# Altium PCB PCB1.pcbdoc
Units mil, origin at the board's own origin, x right, y up, seen from the top; angles counter-clockwise.
Board outline 3474.41 x 2203.83 mil, 2 copper layers (Top Layer, Bottom Layer), stack 62.206 mil thick; 45 components, 37 nets, 140 pads, 20 vias.
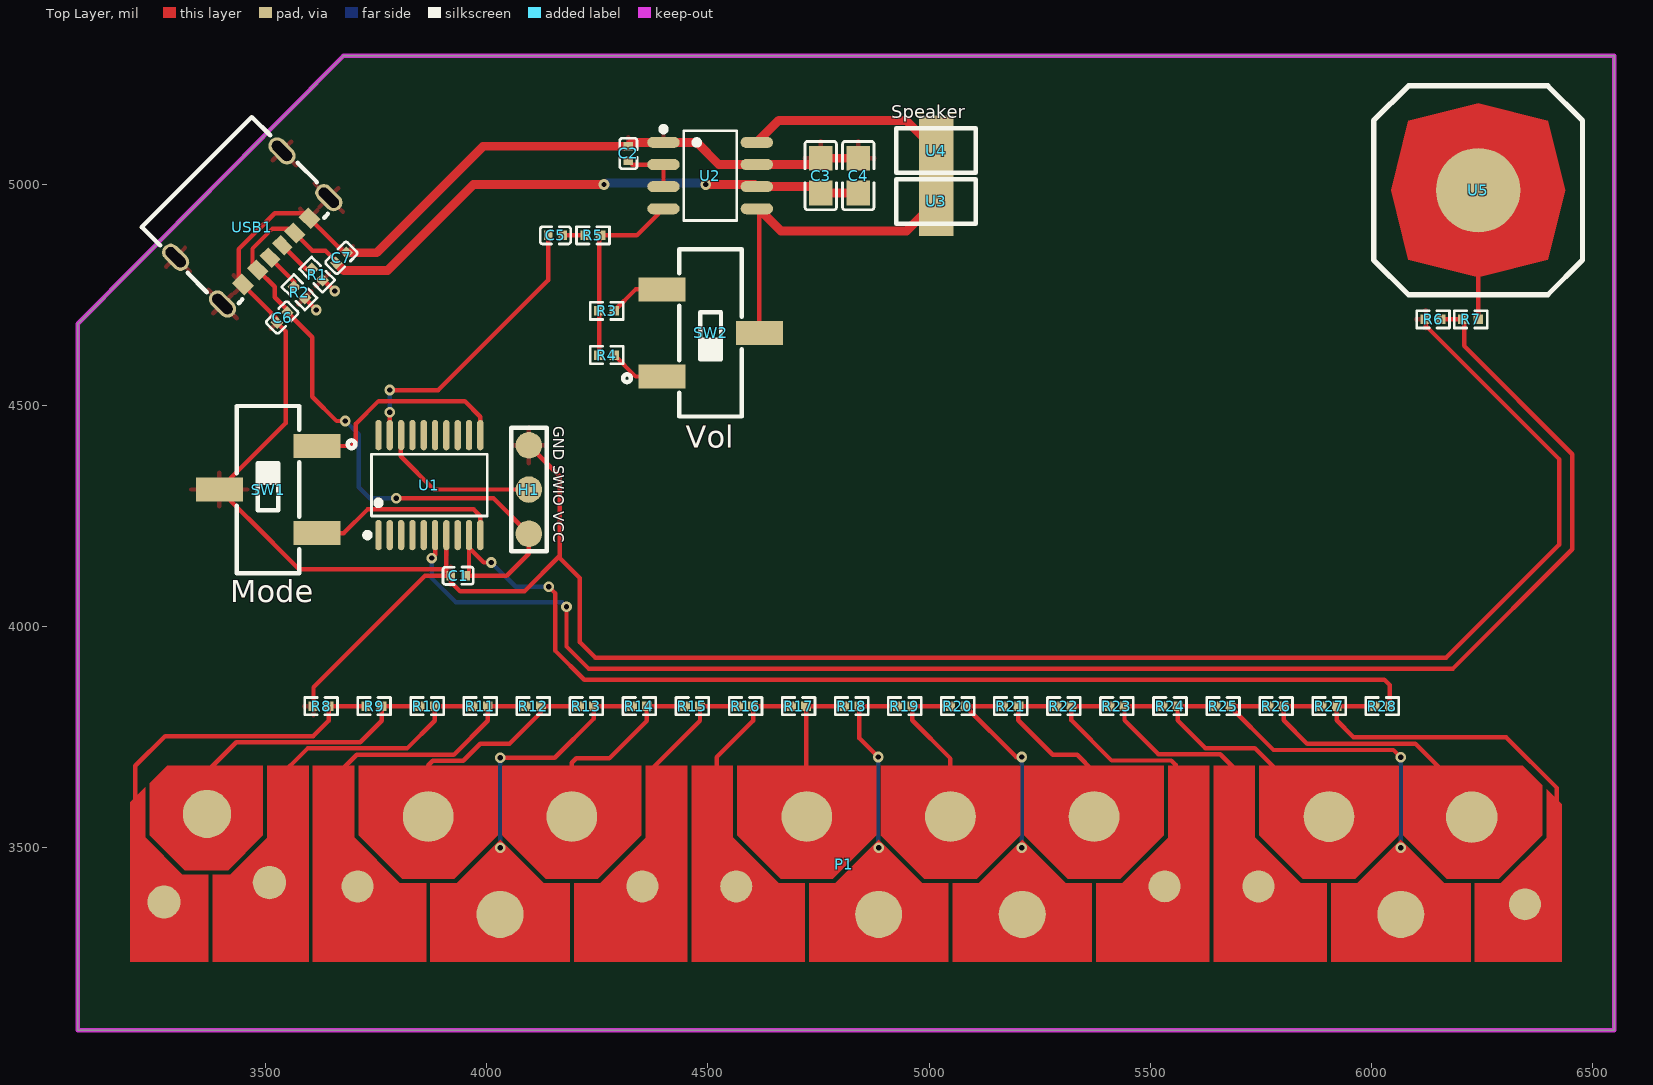
[diagram p0: Top Layer view]
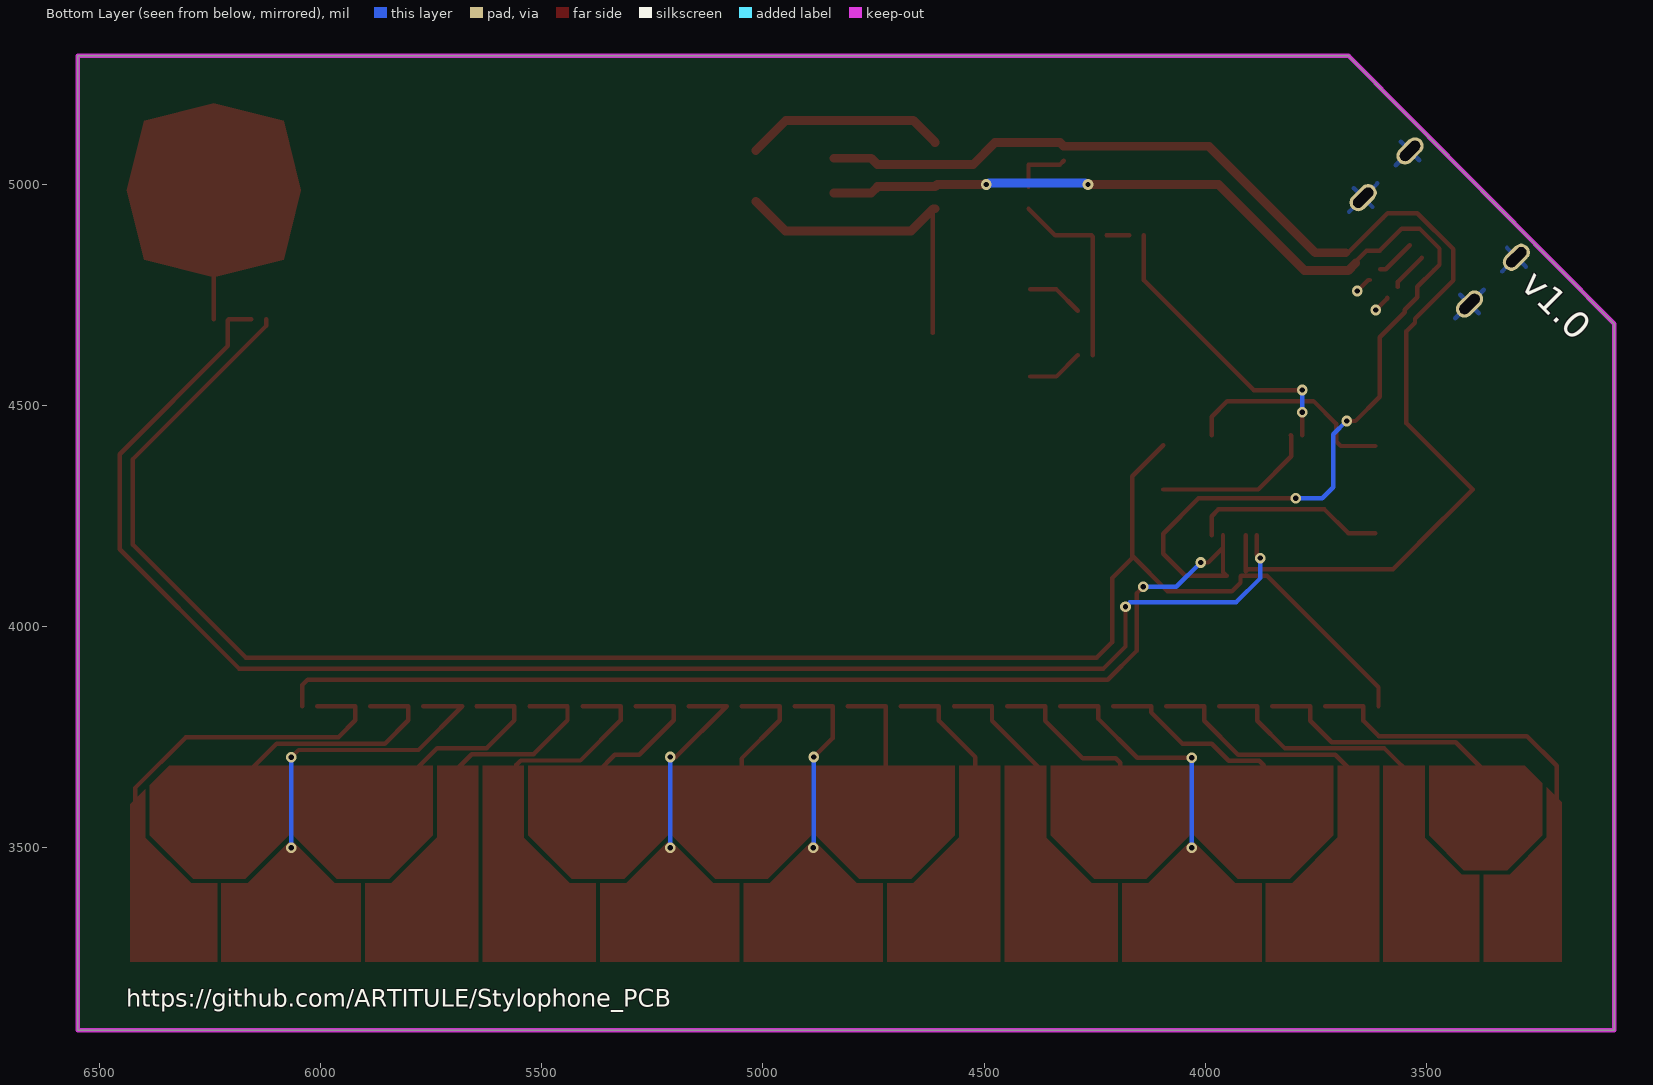
[diagram p1: Bottom Layer view, seen from below]

## Layer stack, top to bottom
Top Solder Mask Layer: solder mask 0.394, Dk 3.3
Top Layer: signal copper 1.379
Dielectric1: surface 59.449, FR4, Dk 4.5
Bottom Layer: signal copper 1.378
Bottom Solder Mask Layer: solder mask 0.394, Dk 3.3

## Board outline
3075,4685.14 3675.46,5290.76 6549.41,5290.76 6549.41,3086.93 3075,3086.93

## Design rules (kind name [scope] priority, off if disabled: settings)
BoardOutlineClearance copperThickness1oz [All] p0: genericclearance=10 ignorepadtopadclearanceinfootprint=FALSE except(0: Arc-SplitContinuation Track-SplitContinuation SMDPad-SplitContinuation THPad-SplitContinuation Via-SplitContinuation Fill-SplitContinuation Poly-SplitContinuation Region-SplitContinuation Text-SplitContinuation)
BoardOutlineClearance copperThickness2oz [All] p0: genericclearance=10 ignorepadtopadclearanceinfootprint=FALSE except(0: Arc-SplitContinuation Track-SplitContinuation SMDPad-SplitContinuation THPad-SplitContinuation Via-SplitContinuation Fill-SplitContinuation Poly-SplitContinuation Region-SplitContinuation Text-SplitContinuation)
BoardOutlineClearance otherClearance [All] p0: genericclearance=10 ignorepadtopadclearanceinfootprint=FALSE except(0: Arc-SplitContinuation Track-SplitContinuation SMDPad-SplitContinuation THPad-SplitContinuation Via-SplitContinuation Fill-SplitContinuation Poly-SplitContinuation Region-SplitContinuation Text-SplitContinuation)
Clearance copperThickness1oz [All] p1: gap=7 ignorepadtopadclearanceinfootprint=FALSE
Clearance copperThickness2oz [All] p1: gap=7 ignorepadtopadclearanceinfootprint=FALSE
Clearance otherClearance [All] p1: gap=7 ignorepadtopadclearanceinfootprint=FALSE
DiffPairsRouting differentialPair [All] p1: maxuncoupledlength=10 minlimit=6 maxlimit=Infinity mostfreqgap=6 toplayer_minwidth=5 toplayer_prefwidth=10 toplayer_maxwidth=100 bottomlayer_minwidth=5 bottomlayer_prefwidth=10 bottomlayer_maxwidth=100
PasteMaskExpansion pasteMaskExpansion [All] p1: expansion=0
PlaneConnect innerPlane [All] p1: planeconnectstyle=Relief reliefexpansion=20 reliefentries=4 reliefconductorwidth=10 reliefairgap=10
PolygonConnect copperRegion [All] p1: connectstyle=Relief reliefentries=4 reliefconductorwidth=10 polygonreliefangle="90 Angle" airgapwidth=10
RoutingVias viaSize [All] p1: viastyle="Through Hole" holewidth=12.0078 minholewidth=11.811 maxholewidth=248.0314 width=12.0078 minwidth=11.811 maxwidth=248.0314
SolderMaskExpansion solderMaskExpansion [IsVia] p1: useseparateexpansions=TRUE expansion=-1000 expansionbottom=-1000
SolderMaskExpansion solderMaskExpansion [All] p2: useseparateexpansions=TRUE expansion=2 expansionbottom=2
Width copperThickness1oz [All] p1: maxlimit=100 minlimit=5 preferedwidth=10
Width copperThickness2oz [All] p1: maxlimit=100 minlimit=8 preferedwidth=10

## Components (designator, comment, footprint, x,y, rotation, side; value= is the part's Value field where it differs from the comment)
C1 "100nF" C0402 3935,4115 r0 top
C2 "1uF" C0402 4320,5070 r270 top
C3 "1uF" C0805 4755,5020 r270 top
C4 "22uF" C0805 4840,5020 r270 top
C5 "470nF" C0402 4155,4885 r0 top
C6 "100nF" C0402 3537,4699 r45 top
C7 "1uF" C0402 3671,4834 r225 top
H1 "" "Top side pads" 4095,4210 r180 top
P1 "Stylophone Pads" Stylophone_Pads_Footprint 3193.11,3242.48 r0 top
R1 "5.1kΩ" R0402 3616,4796 r135 top
R2 "5.1kΩ" R0402 3576,4756 r135 top
R3 "18kΩ" R0402 4270.89,4714.11 r0 top
R4 "51kΩ" R0402 4270.89,4614.11 r0 top
R5 "18kΩ" R0402 4240,4885 r0 top
R6 "1.6MΩ" R0402 6140,4695 r0 top
R7 "1kΩ" R0402 6225,4695 r0 top
R8 "1kΩ" R0402 3625,3820 r0 top
R9 "1kΩ" R0402 3745,3820 r0 top
R10 "1kΩ" R0402 3865,3820 r180 top
R11 "1kΩ" R0402 3985,3820 r180 top
R12 "1kΩ" R0402 4105,3820 r180 top
R13 "1kΩ" R0402 4225,3820 r180 top
R14 "1kΩ" R0402 4345,3820 r180 top
R15 "1kΩ" R0402 4465,3820 r180 top
R16 "1kΩ" R0402 4585,3820 r180 top
R17 "1kΩ" R0402 4705,3820 r180 top
R18 "1kΩ" R0402 4825,3820 r180 top
R19 "1kΩ" R0402 4945,3820 r180 top
R20 "1kΩ" R0402 5065,3820 r180 top
R21 "1kΩ" R0402 5185,3820 r180 top
R22 "1kΩ" R0402 5305,3820 r180 top
R23 "1kΩ" R0402 5425,3820 r180 top
R24 "1kΩ" R0402 5545,3820 r180 top
R25 "1kΩ" R0402 5665,3820 r180 top
R26 "1kΩ" R0402 5785,3820 r180 top
R27 "1kΩ" R0402 5905,3820 r180 top
R28 "1kΩ" R0402 6025,3820 r180 top
SW1 "LSSAM12-V-T/R" SW-SMD_LSSAM12-V-T-R 3505,4310 r270 top
SW2 "LSSAM12-V-T/R" SW-SMD_LSSAM12-V-T-R 4505.89,4664.11 r90 top
U1 "CH32V003F4P6" TSSOP-20_L6.5-W4.4-P0.65-LS6.4-BL 3870,4320 r0 top
U2 "FM8002A" SOP-8_L4.9-W3.9-P1.27-LS6.0-BL 4505,5020 r270 top
U3 "" Pad2mmx4mm 5095,4883 r90 top
U4 "" Pad2mmx4mm 5095,4998 r90 top
U5 "" Big_Pad_5x5mm 6045,4790 r0 top
USB1 "USB4125-GF-A" USB-C-SMD_TYPE-C-6P 3470,4902.03 r225 top

## Footprints (in the part's own frame and the unit in brackets; to place one, negate y for a bottom-side part, rotate by r counter-clockwise, add the part's x,y. Pads: shape width x height; smd on the part's side, far side on the other; paste and mask are expansions set on the pad)
Big_Pad_5x5mm [mm]
  round 4.851 smd: 1(5,5)
  Top Layer region: 5,0 1,1 0,5 1,9 5,10 9,9 10,5 9,1
  silkscreen extent -1,-1 11,11
C0402 [mm]
  rect 0.5x0.54 smd paste+0 mask+0.051: 1(-0.42,0) 2(0.42,0)
  silkscreen extent -0.87,-0.5 0.87,0.5
C0805 [mm]
  rect 1.41x1.35 smd paste-100 mask+0.051: 1(-1,0) 2(1,0)
  silkscreen extent -1.96,-0.9 1.96,0.9
Pad2mmx4mm [mm]
  rect 4x2 smd: 1(2,2)
  silkscreen extent 0.71,-0.28 3.28,4.29
R0402 [mm]
  rect 0.566x0.54 smd paste-100 mask+0.051: 1(-0.433,0) 2(0.433,0)
  silkscreen extent -0.94,-0.5 0.94,0.5
SOP-8_L4.9-W3.9-P1.27-LS6.0-BL [mm]
  oval 0.63x1.865 smd: 1(-1.905,-2.682) 2(-0.635,-2.682) 3(0.635,-2.682) 4(1.905,-2.682) 5(1.905,2.682) 6(0.635,2.682) 7(-0.635,2.682) 8(-1.905,2.682)
  silkscreen extent -2.82,-2.83 2.58,1.52
Stylophone_Pads_Footprint [mm]
  round 1.899 smd: 1(1.948,3.419)
  round 2.768 smd: 2(4.417,8.482)
  round 1.92 smd: 3(8.003,4.538)
  round 1.846 smd: 4(13.072,4.317) 16(64.821,4.318)
  round 2.92 smd: 5(17.125,8.33) 7(25.375,8.33) 10(38.875,8.33) 12(47.125,8.33) 14(55.375,8.33)
  round 2.706 smd: 6(21.25,2.706) 11(43,2.706) 13(51.25,2.706) 18(73,2.706)
  round 1.844 smd: 8(29.428,4.32)
  round 1.845 smd: 9(34.821,4.32)
  round 1.843 smd: 15(59.429,4.322)
  round 2.918 smd: 17(68.875,8.328)
  round 2.959 smd: 19(77.074,8.297)
  round 1.832 smd: 20(80.129,3.288)
  Top Layer region: 3.125,5.25 1.125,7.25 1.125,10.25 2.125,11.25 7.625,11.25 7.625,7.25 5.625,5.25
  Top Layer region: 10.25,0 4.75,0 4.75,5 5.75,5 7.864,7.114 7.864,11.246 10.25,11.246
  Top Layer region: 0,0 0.003,9.157 0.871,10.026 0.871,7.129 3,5 4.5,5 4.5,0
  Top Layer region: 13.125,11.25 21.125,11.25 21.125,7.25 18.625,4.75 15.625,4.75 13.125,7.25
  Top Layer region: 17.25,0 17.25,4.5 18.75,4.5 21.25,7 23.75,4.5 25.25,4.5 25.25,0
  Top Layer region: 21.375,11.25 29.375,11.25 29.375,7.25 26.875,4.75 23.875,4.75 21.375,7.25
  Top Layer region: 10.5,0 10.5,11.239 12.872,11.239 12.872,7.128 15.5,4.5 17,4.5 17,0
  Top Layer region: 25.5,4.5 27,4.5 29.624,7.124 29.624,11.244 32,11.244 32,0 25.5,0
  Top Layer region: 34.875,11.25 42.875,11.25 42.875,7.25 40.375,4.75 37.375,4.75 34.875,7.25
  Top Layer region: 39,0 39,4.5 40.5,4.5 43,7 45.5,4.5 47,4.5 47,0
  Top Layer region: 47.25,0 47.25,4.5 48.75,4.5 51.25,7 53.75,4.5 55.25,4.5 55.25,0
  Top Layer region: 51.375,11.25 59.375,11.25 59.375,7.25 56.875,4.75 53.875,4.75 51.375,7.25
  Top Layer region: 43.125,11.25 51.125,11.25 51.125,7.25 48.625,4.75 45.625,4.75 43.125,7.25
  Top Layer region: 32.25,0 32.25,11.255 34.616,11.255 34.616,7.134 37.25,4.5 38.75,4.5 38.75,0
  Top Layer region: 55.5,0 55.5,4.5 57,4.5 59.625,7.125 59.625,11.251 62,11.251 62,0
  Top Layer region: 62.25,0 62.25,11.259 64.61,11.259 64.61,7.14 67.25,4.5 68.75,4.5 68.75,0
  Top Layer region: 64.875,11.246 72.875,11.246 72.875,7.25 70.375,4.75 67.375,4.75 64.875,7.25
  Top Layer region: 69,0 69,4.5 70.5,4.5 73,7 75.5,4.5 77,4.5 77,0
  Top Layer region: 73.125,11.255 79.992,11.255 81.125,10.122 81.125,7.25 78.625,4.75 75.625,4.75 73.125,7.25
  Top Layer region: 77.25,0 77.25,4.5 78.75,4.5 81.366,7.116 81.366,9.908 82.248,9.026 82.25,0
SW-SMD_LSSAM12-V-T-R [mm]
  rect 1.4x2.7 smd: 1(-2.5,2.8) 2(0,-2.8) 3(2.5,2.8)
  silkscreen extent -4.8,-1.8 4.8,5.02
"Top side pads" [mil]
  round 60 smd: 1(0,0) 2(0,-100) 3(0,-200)
  silkscreen extent -40,-240 40,40
TSSOP-20_L6.5-W4.4-P0.65-LS6.4-BL [mil]
  oval 14.33x68.58 smd: 1(-115.16,-113.03) 2(-89.57,-113.03) 3(-63.98,-113.03) 4(-38.39,-113.03) 5(-12.79,-113.03) 6(12.8,-113.03) 7(38.39,-113.03) 8(63.98,-113.03) 9(89.57,-113.03) 10(115.16,-113.03) 11(115.16,113.03) 12(89.57,113.03) 13(63.98,113.03) 14(38.39,113.03) 15(12.8,113.03) 16(-12.79,113.03) 17(-38.39,113.03) 18(-63.98,113.03) 19(-89.57,113.03) 20(-115.16,113.03)
  silkscreen extent -146,-119 131,70
USB-C-SMD_TYPE-C-6P [mm]
  oval 1x1.8 hole 0.6 slot 1.4 at 90 deg paste+0 mask+0.05: 1(-4.32,1.875) 1(-4.32,-1.925) 2(4.32,-1.925) 2(4.32,1.875)
  rect 0.7x1 smd paste-100 mask+0.05: A5(-0.499,1.925) B5(0.501,1.925)
  rect 0.75x1 smd paste-100 mask+0.05: A9(1.501,1.925) B9(-1.499,1.925)
  rect 0.8x1 smd paste-100 mask+0.05: A12(2.701,1.925) B12(-2.699,1.925)
  silkscreen extent -4.47,-4.52 4.47,2.5

## Via types
v1: diameter 24.02, hole 12, Top Layer to Bottom Layer, 20 vias

## Nets (pads, with @x,y where several pads share a name; then routed paths per layer and width w, separated by ;. In a path a pad name is that pad's centre, name@x,y a point inside that pad or via, vN(x,y) a via of type N, cw(c..) or ccw(c..) an arc to the next point about the centre after c; other vN are vias at no path point)
$1N3: C2.2 U2.2 U2.3 | length 132.9
  Top Layer w10: C2.2 4328.46,5045 U2.2 U2.3
$1N5: R3.1 R4.1 R5.2 U2.4 | length 439.4
  Top Layer w10: R4.1 R3.1 4253.85,4881.81 R5.2 4339.39,4885 U2.4
$1N6: C5.2 R5.1 | length 51.4
  Top Layer w10: C5.2 R5.1
$1N8: R3.2 SW2.3 | length 127.8
  Top Layer w10: R3.2 4336.35,4762.53 SW2.3
$1N9: R4.2 SW2.1 | length 127.8
  Top Layer w10: R4.2 4336.35,4565.69 SW2.1
$1N20: R2.2 USB1.B5 | length 88.9
  Top Layer w10: USB1.B5 3563.95,4780.17 R2.2
$1N21: R1.2 USB1.A5 | length 89
  Top Layer w10: USB1.A5 3591.75,4808.05 R1.2
+5V: C1.2 C3.2 C4.2 C6.2 C7.2 H1.1 R28.1 U1.9 U2.6 USB1.A9 USB1.B9 | length 5243.3
  Top Layer w10: C7.2 3659.3,4825.7 3635,4850 3605.48,4850 USB1.B9 3555.32,4900.16 3515.16,4900.16 3470,4855 3470,4818.46 USB1.A9 3520,4768.46 3520,4745 3548.7,4716.3 C6.2 3605,4654.39 3605,4520 3660,4465 v1(3680,4465) ; v1(3795,4290) 4015,4290 H1.1 4095,4165 4045,4115 C1.2 3959.57,4123.03 U1.9@3959.57,4178.47 ; U1.9 U1.9@3959.57,4178.47 ; v1(4010,4145) 3993.04,4145 U1.9@3959.57,4178.47 ; v1(4140,4090) 4155,4075 4155,3945 4220,3880 6030,3880 6042.04,3867.96 R28.1
  Top Layer w20: C7.2 3676.61,4805 3775,4805 3970,5000 v1(4265,5000) ; v1(4495,5000) 4605.61,5000 U2.6 4740.63,4995 C3.2 C4.2
  Bottom Layer w10: v1(3680,4465) 3710,4435 3710,4315 3735,4290 v1(3795,4290) ; v1(4010,4145) 4065,4090 v1(4140,4090) ; v1(4265,5000) v1@4266.49,4998.51 ; v1@4493.51,4998.51 v1(4495,5000)
  Bottom Layer w20: v1@4266.49,4998.51 4271.13,5003.14 4488.87,5003.14 v1@4493.51,4998.51
ADC: R6.2 R7.1 U1.6 | length 3602.9
  Top Layer w10: v1(3875,4155) 3882.8,4162.8 U1.6 ; v1(4180,4045) 4180,3955 4230,3905 6185,3905 6455,4175 6455,4390 6210,4635 6210,4692.96 R7.1 R6.2
  Bottom Layer w10: v1(3875,4155) 3875,4110 3930,4055 4170,4055 v1(4180,4045)
Amp_IN: C5.1 U1.19 | length 664.5
  Top Layer w10: U1.19 v1(3780.43,4485) ; v1(3780.43,4535) 3890,4535 4138.46,4783.46 C5.1
  Bottom Layer w10: v1(3780.43,4485) v1(3780.43,4535)
GND: C1.1 C2.1 C3.1 C4.1 C6.1 C7.1 H1.3 R1.1 R2.1 R6.1 R8.1 SW1.2 U1.7 U2.1 U2.7 USB1.1 USB1.2 USB1.A12 USB1.B12 | length 7224.4
  Top Layer w10: R2.1 3588.05,4741.95 v1(3614,4716) ; R8.1 3607.96,3862.96 3860,4115 C1.1 3920,4113.46 3920,4099.32 3939.32,4080 4085,4080 4165,4160 ; R1.1 3631.05,4783.95 v1(3656,4759) ; C7.1 3676.61,4845.7 USB1.B12 3587.3,4935 3520,4935 3438.4,4853.4 3438.4,4783.24 USB1.A12 3525.3,4696.34 C6.1 3545,4667.61 3545,4460.24 SW1.2 3459.76,4245 3460,4245 3575,4130 3903.46,4130 3908.39,4125.07 U1.7 ; H1.3 4165,4340 4165,4160 ; R6.1 6122.96,4680.86 6425,4378.82 6425,4185 6170,3930 4245,3930 4210,3965 4210,4110 4165,4155 4165,4160
  Top Layer w20: C7.1 3750.7,4845.7 3991.54,5086.54 C2.1 4328.46,5095 U2.1 4475,5095 4525,5045 U2.7 4740.63,5045 C3.1 C4.1
Key_1: P1.1 R8.2 R9.1 | length 862.8
  Top Layer w10: 3251.95,3439.83 3205,3486.78 3205,3685 3272.44,3752.44 3607.44,3752.44 3642.04,3787.04 R8.2 R9.1
Key_2: P1.2 R9.2 R10.2 | length 667
  Top Layer w10: P1.2@3365.35,3567.28 3365.35,3670.35 3433.43,3738.43 3713.43,3738.43 3762.04,3787.04 R9.2 R10.2
Key_3: P1.3 R10.1 R11.2 | length 723.7
  Top Layer w10: 3520.33,3463.86 3520.33,3650.33 3594.41,3724.41 3819.41,3724.41 3882.04,3787.04 R10.1 R11.2
Key_4: P1.4 R11.1 R12.2 | length 718.1
  Top Layer w10: 3682.88,3463.73 3665,3481.61 3665,3670 3705.39,3710.39 3925.39,3710.39 4002.04,3787.04 R11.1 R12.2
Key_5: P1.5 R12.1 R13.2 | length 533.2
  Top Layer w10: P1.5@3867.32,3557.44 3867.32,3686.38 3877.32,3696.38 3946.38,3696.38 3985,3735 4051.18,3735 4122.04,3805.86 R12.1 R13.2
Key_6: P1.6 R13.1 R14.2 | length 685.9
  Top Layer w10: P1.6@4029.72,3380.28 4030,3380.55 v1(4030,3500) ; v1(4030,3703.39) 4153.39,3703.39 4242.04,3792.04 R13.1 R14.2
  Bottom Layer w10: v1(4030,3500) v1(4030,3703.39)
Key_7: P1.7 R14.1 R15.2 | length 462.8
  Top Layer w10: P1.7@4192.13,3557.44 4192.13,3692.13 4202.13,3702.13 4277.13,3702.13 4362.04,3787.04 R14.1 R15.2
Key_8: P1.8 R15.1 R16.2 | length 485.8
  Top Layer w10: 4376.62,3463.83 4376.62,3681.62 4482.04,3787.04 R15.1 R16.2
Key_9: P1.9 R16.1 R17.2 | length 483.7
  Top Layer w10: 4539.03,3464.04 4520,3483.06 4520,3705 4602.04,3787.04 R16.1 R17.2
Key_10: P1.10 R17.1 R18.2 | length 349.1
  Top Layer w10: P1.10@4723.62,3557.44 4722.04,3559.02 R17.1 R18.2
Key_11: P1.11 R18.1 R19.2 | length 543.8
  Top Layer w10: v1(4885,3705) 4842.04,3747.96 R18.1 R19.2 ; P1.11@4886.02,3380.28 v1(4886,3500)
  Bottom Layer w10: v1(4885,3705) 4885,3501 v1(4886,3500)
Key_12: P1.12 R19.1 R20.2 | length 384.3
  Top Layer w10: R20.2 R19.1 4962.04,3787.96 5048.43,3701.57 P1.12@5048.43,3557.44
Key_13: P1.13 R20.1 R21.2 | length 586.6
  Top Layer w10: R21.2 R20.1 5197.04,3705 v1(5210,3705) ; v1(5210,3500) 5210,3381.1 P1.13@5210.83,3380.28
  Bottom Layer w10: v1(5210,3500) v1(5210,3705)
Key_14: P1.14 R21.1 R22.2 | length 451.6
  Top Layer w10: R22.2 R21.1 5202.04,3787.96 5280,3710 5335,3710 5373.23,3671.77 P1.14@5373.23,3557.44
Key_15: P1.15 R22.1 R23.2 | length 618.7
  Top Layer w10: R23.2 R22.1 5322.04,3787.96 5412.79,3697.21 5547.79,3697.21 5557.79,3687.21 5557.79,3463.96
Key_16: P1.16 R23.1 R24.2 | length 639
  Top Layer w10: R24.2 R23.1 5442.04,3787.96 5518.77,3711.23 5658.77,3711.23 5720.09,3649.91 5720.09,3464.11
Key_17: P1.17 R24.1 R25.2 | length 556.2
  Top Layer w10: R25.2 R24.1 5562.04,3787.96 5624.76,3725.24 5736.85,3725.24 P1.17@5904.72,3557.37
Key_18: P1.18 R25.1 R26.2 | length 846.9
  Top Layer w10: R26.2 5680,3820 5779.02,3720.98 6050.26,3720.98 v1(6067,3704.25) ; v1(6067,3500) 6067.13,3499.87 P1.18@6067.13,3380.28
  Bottom Layer w10: v1(6067,3500) v1(6067,3704.25)
Key_19: P1.19 R26.1 R27.2 | length 669
  Top Layer w10: R27.2 R26.1 5802.04,3787.96 5855,3735 6100,3735 6229.53,3605.47 P1.19@6229.53,3557.54
Key_20: P1.20 R27.1 R28.2 | length 896.9
  Top Layer w10: R28.2 R27.1 5922.04,3787.96 5960,3750 6305,3750 6420,3635 6420,3486.21 6371.32,3437.53
Speaker_OUT+: U2.8 U4.1 | length 455
  Top Layer w20: U2.8 4610.61,5095.61 4660,5145 4948,5145 U4.1
Speaker_OUT-: SW2.2 U2.5 U3.1 | length 729.4
  Top Layer w10: SW2.2 U2.5@4616.13,4939.48
  Top Layer w20: U2.5 4615,4945 4665,4895 4949.52,4895 U3.1
Stylus: R7.2 U5.1 | length 291.9
  Top Layer w10: U5.1 6242.04,4986.66 R7.2
Sw_1: SW1.3 U1.10 | length 441.2
  Top Layer w10: SW1.3 3676.58,4211.58 3730,4265 3970,4265 3985.16,4249.84 U1.10
Sw_2: SW1.1 U1.11 | length 491.8
  Top Layer w10: SW1.1 3693.42,4408.42 3703.42,4418.42 3703.42,4458.42 3755,4510 3950,4510 3985.16,4474.84 U1.11
SWIO: H1.2 U1.18 | length 369.5
  Top Layer w10: U1.18 3805,4432.01 3805,4385 3880,4310 H1.2
pads on no net: U1.1 U1.2 U1.3 U1.4 U1.5 U1.8 U1.12 U1.13 U1.14 U1.15 U1.16 U1.17 U1.20

## Polygon pours and split planes (outlines as drawn)
GND on Top Layer (solid, remove dead copper, pour order 0): 3005,5395 3005,3000 6660,3000 6660,5395
GND on Bottom Layer (solid, remove dead copper, pour order 2): 3000,5390 3000,3005 6670,3005 6670,5390

## Keep-outs
Board Outline Layer:
  the board outline again, w10

## Silkscreen, mask and mechanical layers (free items; w line width, h text height)
Top Silkscreen Layer:
  text "Speaker" at 4915,5150 h30
  text "GND SWIO VCC" at 4150,4453 h25 r270
  text "Vol" at 4450,4405 h50
  text "Mode" at 3420,4055 h50
Bottom Silkscreen Layer:
  text "v1.0" at 3290,4770 h60 r45
  text "https://github.com/ARTITULE/Stylophone_PCB" at 6440,3140 h40